# Altium PCB EFI.PcbDoc (part 1 of 3)
Units mm, origin at the board's own origin, x right, y up, seen from the top; angles counter-clockwise.
Board outline 100.1 x 100.83 mm, 2 copper layers (Top Layer, Bottom Layer), stack 1.57 mm thick; 101 components, 85 nets, 326 pads, 97 vias.
Unrouted connection lines stored in the file: 58.
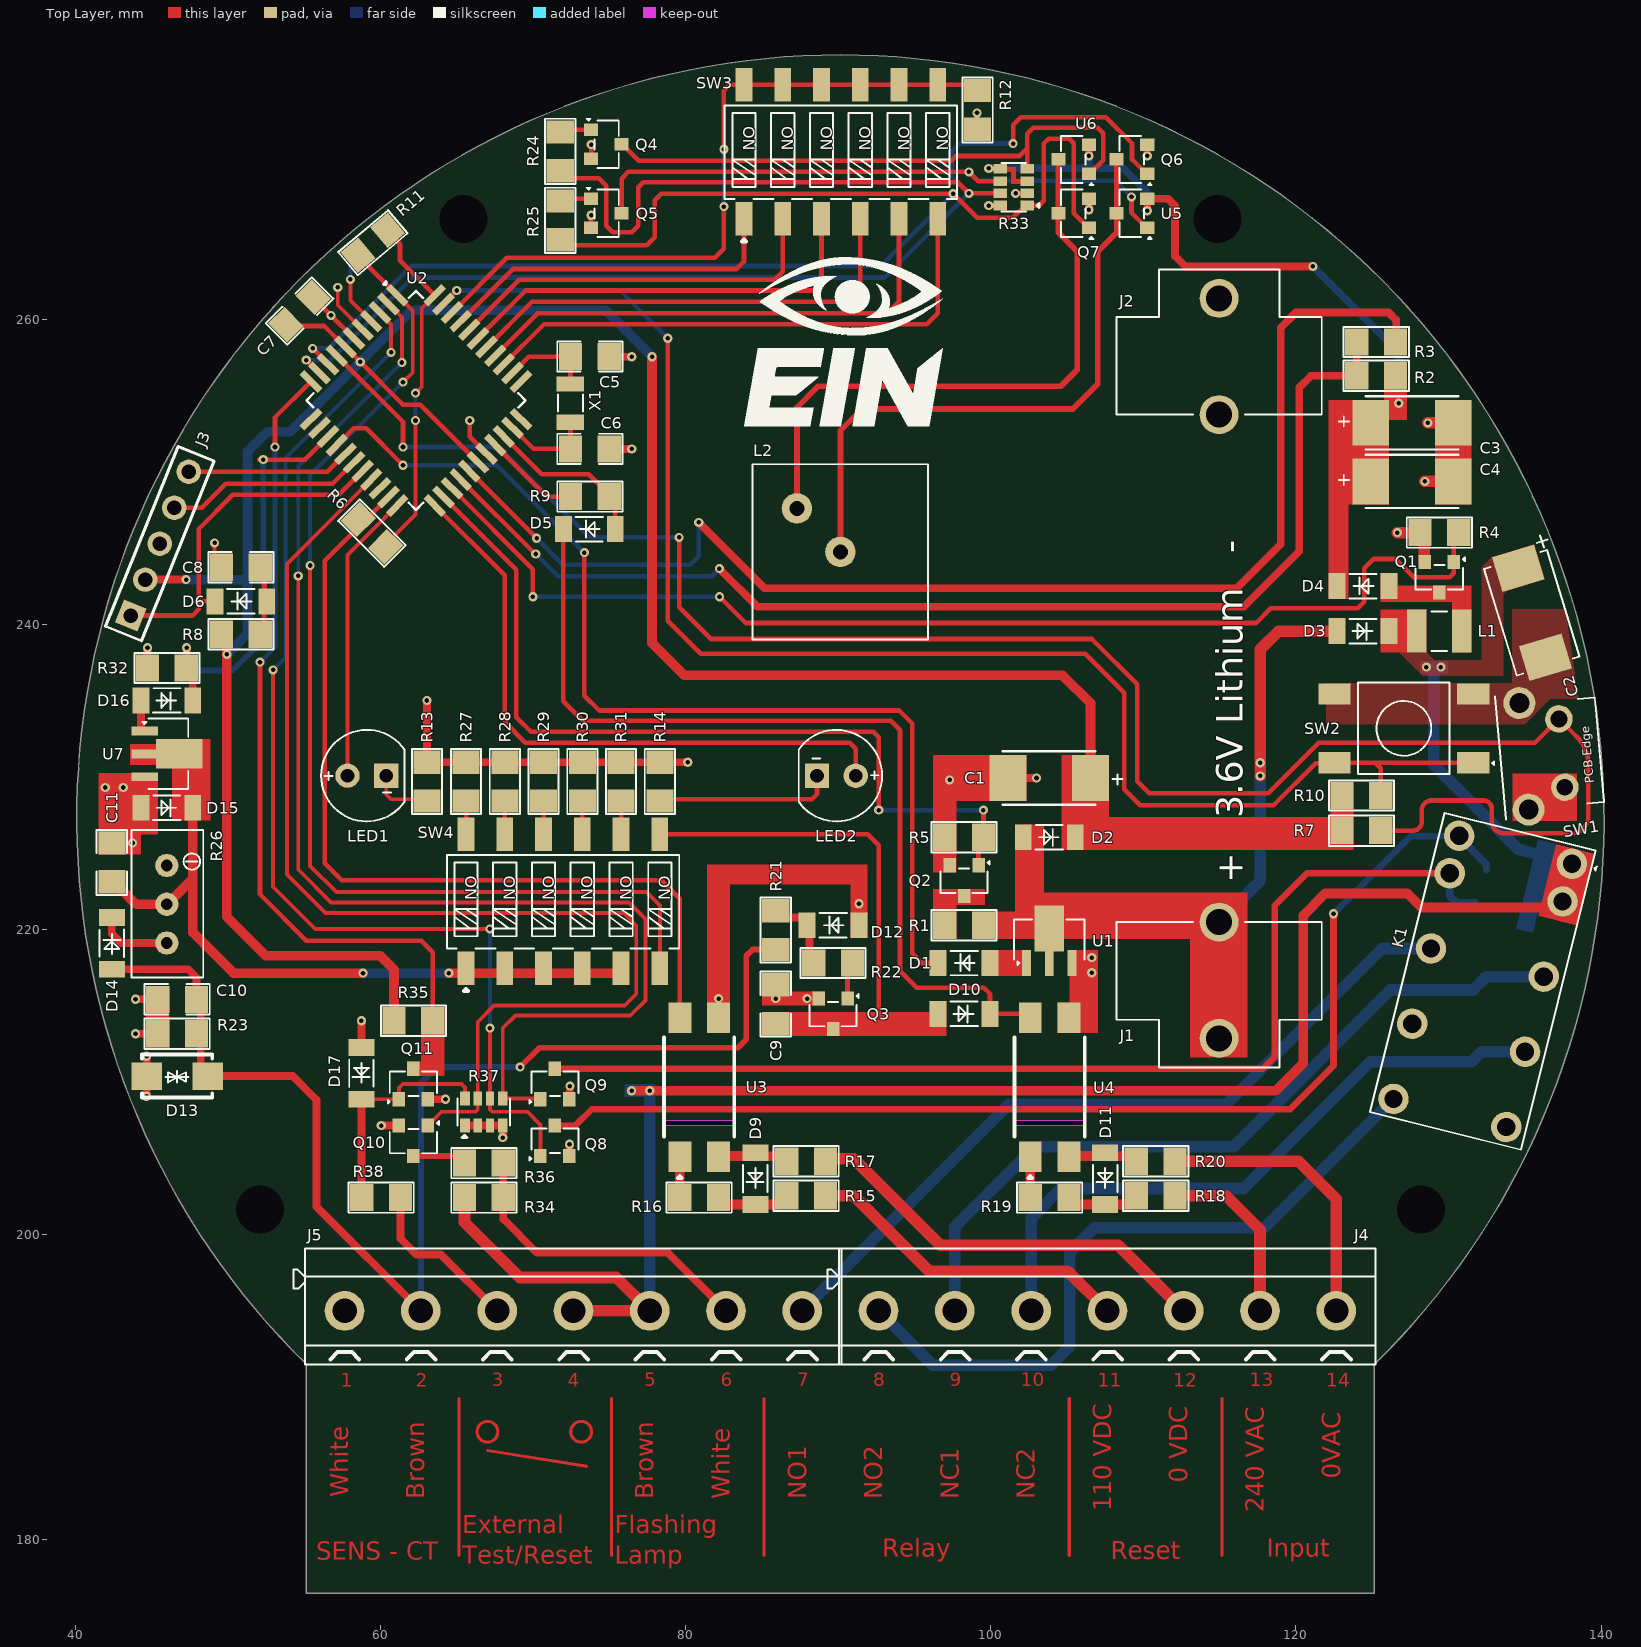
[diagram p0: Top Layer view]
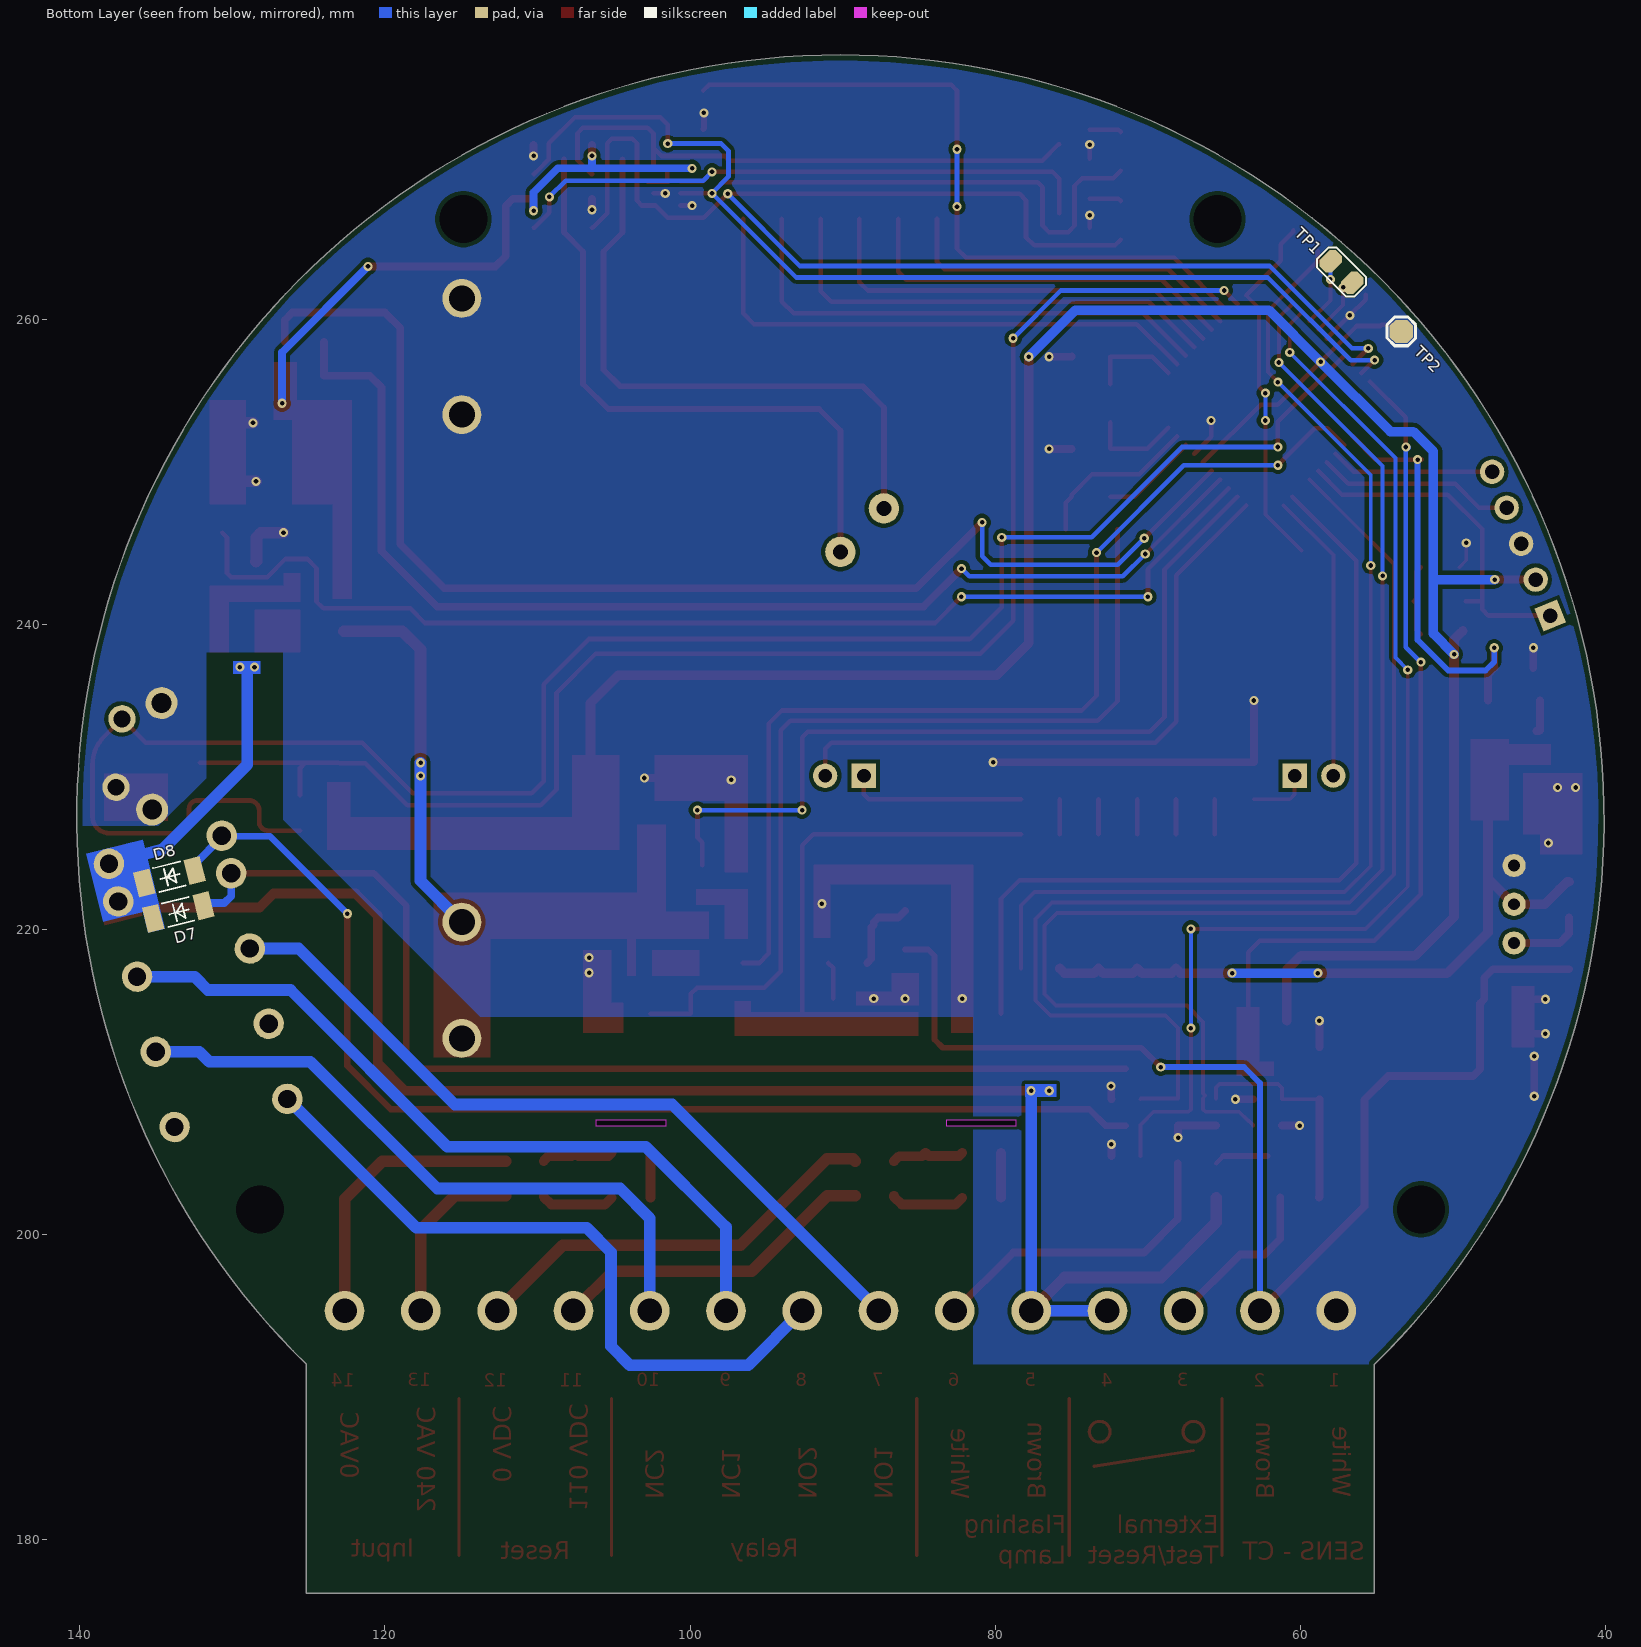
[diagram p1: Bottom Layer view, seen from below]

## Layer stack, top to bottom
Top Solder: solder mask 0.01, Solder Resist, Dk 3.5
Top Layer: signal copper 0.035
Dielectric 1: core 1.5, FR-4, Dk 4.8
Bottom Layer: signal copper 0.035
Bottom Solder: solder mask 0.01, Solder Resist, Dk 3.5

## Board outline
55.145,176.491 55.145,191.491 cw(c90.145,227.267) 125.145,191.491 125.145,176.491
cut-out: 101.576,207.137 101.576,207.48 106.17,207.48 106.17,207.137
cut-out: 78.606,207.137 78.606,207.48 83.199,207.48 83.199,207.137

## Design rules (kind name [scope] priority, off if disabled: settings)
BoardOutlineClearance [All] p1: gap=0 ignorepadtopadclearanceinfootprint=FALSE except(0.381: Poly-OutlineEdge)
Clearance [All] p1: gap=0.254 ignorepadtopadclearanceinfootprint=TRUE
ComponentClearance [All] p1: gap=0 collisioncheckmode=3 verticalgap=0 showdistances=FALSE
HoleSize [All] p1: absolutevalues=TRUE maxlimit=3.15 minlimit=0 maxpercent=80.000 minpercent=20.000
HoleToHoleClearance [All] p1: gap=0 allowstackedmicrovias=TRUE
MinimumSolderMaskSliver [All] p1: minsoldermaskwidth=0
PolygonConnect [All] p1: connectstyle=Direct reliefconductorwidth=0.254 reliefentries=4 polygonreliefangle="90 Angle" airgapwidth=0.254
RoutingVias [All] p1: holewidth=0.3 width=0.6 viastyle="Through Hole" minholewidth=0.3 minwidth=0.6 maxholewidth=0.3 maxwidth=0.6
SilkToSilkClearance [All] p1: silktosilkclearance=0
SilkToSolderMaskClearance [IsPad] p1: minsilkscreentomaskgap=0 clearancetoexposedcopper=TRUE
SolderMaskExpansion [All] p1: expansion=0.102 istentingtop=FALSE
UnRoutedNet [All] p1: checkbadconnections=TRUE
Width [All] p1: maxlimit=0.762 minlimit=0.203 preferedwidth=0.254 minimp=50.000000 maximp=50.000000 favimp=50.000000
23 further rules are at their usual default settings.

## Classes and differential pairs
component class U_Power_Sheet: C1 C2 C3 C4 D1 D2 D3 D4 J1 J2 L1 Q1 Q2 R1 R2 R3 R4 R5 U1
component class U_Peripheral_Sheet: C9 C10 C11 D7 D8 D9 D10 D11 D12 D13 D14 D15 D16 D17 K1 Q3 Q4 Q5 Q6 Q7 Q8 Q9 Q10 Q11 R15 R16 R17 R18 R19 R20 R21 R22 R23 R24 R25 R26 R27 R28 R29 R30 R31 R32 R33 R34 R35 R36 R37 SW4 U3 U4 U5 U6 U7
component class U_Controller_Sheet: C5 C6 C7 C8 D5 D6 J3 LED1 R6 R7 R8 R9 R10 R11 R12 R13 R14 SW1 SW3 TP1 TP2 U2 X1
component class U_Connector_Sheet: J4 J5 R38

## Components (designator, comment, footprint, x,y, rotation, side; value= is the part's Value field where it differs from the comment)
C1 "47uF" Case-C 103.831,229.921 r180 top
C2 "100uF" Case-D 135.459,240.745 r287 top
C3 "47uF" Case-C 127.603,253.196 r0 top
C4 "47uF" Case-C 127.603,249.361 r0 top
C5 "15pF" Cap-1206 73.718,257.54 r180 top
C6 "15pF" Cap-1206 73.718,251.493 r180 top
C7 "0.1uF" Cap-1206 54.697,260.526 r225 top value=100nF
C8 "0.1uF" Cap-1206 50.851,243.735 r0 top value=100nF
C9 "0.047uF" Cap-1206 85.903,215.098 r270 top
C10 "0.047uF" Cap-1206 46.674,215.413 r0 top
C11 "0.047uF" Cap-1206 42.39,224.387 r270 top
D1 "LL4148_1" LL-34 98.247,217.79 r0 top
D2 "LL4148_1" LL-34 103.831,226.035 r180 top
D3 "LL4148_1" LL-34 124.396,239.546 r180 top
D4 "LL4148_1" LL-34 124.396,242.494 r0 top
D5 "LL4148_1" LL-34 73.685,246.228 r0 top
D6 "LL4148_1" LL-34 50.851,241.5 r0 top
D7 "LL4148_1" LL-34 133.541,221.133 r166 bottom
D8 "LL4148_1" LL-34 134.12,223.448 r166 bottom
D9 "ZMM2V7" LL-34 84.572,203.663 r90 top
D10 "LL4148_1" LL-34 98.247,214.463 r180 top
D11 "ZMM2V7" LL-34 107.498,203.663 r90 top
D12 "ZMM3V6" LL-34 89.662,220.269 r0 top
D13 "SMAJ48CA-E3/61" "SMA Bi Directional" 46.674,210.384 r0 top
D14 "LL4148_1" LL-34 42.39,219.081 r270 top
D15 "ZMM3V6" LL-34 45.997,227.969 r180 top
D16 "LL4148_1" LL-34 45.999,235.001 r180 top
D17 "ZMM3V6" LL-34 58.75,210.564 r90 top
J1 "BK-92" BK-92 114.96,216.662 r180 top locked
J2 "BK-92" BK-92 114.96,257.542 r0 top locked
J3 "X6511WV-05H-C60D30" HDR1X5_ 43.628,240.566 r68 top
J4 "JL301-50007U02" JL301-50007U02 107.645,194.991 r180 top locked
J5 "JL301-50007U02" JL301-50007U02 72.645,194.991 r180 top locked
K1 "AZ832P2-2C-3DE" AZ832P2-2C-3DE 132.241,216.589 r256 top locked
L1 "100uH" NLV32T-101J-EF 129.397,239.546 r0 top
L2 "30NR" 30NR 88.72,246.158 r0 top locked
LED1 "333-2UYD/S530-A3-L" "TH LED 5mm Yellow" 59.106,230.073 r180 top
LED2 "333-2SURC/S530-A3" "TH LED 5mm_" 89.877,230.073 r0 top locked
Q1 "DMG3420UQ-7" SOT-23 129.397,243.09 r180 top
Q2 "DMG3420UQ-7" SOT-23 98.247,223.199 r180 top
Q3 "BC847C,215" SOT-23 89.662,214.463 r180 top
Q4 "BC846B-7-F" SOT-23 74.803,271.45 r270 top
Q5 "BC846B-7-F" SOT-23 74.803,266.929 r270 top
Q6 "DMG3420UQ-7" SOT-23 109.254,270.459 r90 top
Q7 "DMG3420UQ-7" SOT-23 105.428,266.929 r90 top
Q8 "DMG3420UQ-7" SOT-23 71.435,206.137 r0 top
Q9 "DMG3420UQ-7" SOT-23 71.435,209.864 r0 top
Q10 "DMG3420UQ-7" SOT-23 62.154,206.137 r180 top
Q11 "DMG3420UQ-7" SOT-23 62.154,209.864 r0 top
R1 "60.4R" Res-1206 98.247,220.269 r0 top
R2 "220K" Res-1206 125.263,256.284 r0 top
R3 "47K" Res-1206 125.263,258.496 r180 top
R4 "10K" Res-1206 129.397,245.999 r0 top value=10kR
R5 "10K" Res-1206 98.247,226.035 r0 top value=10kR
R6 "220K" Res-1206 59.435,245.969 r135 top
R7 "10K" Res-1206 124.292,226.466 r180 top value=10kR
R8 "220K" Res-1206 50.851,239.341 r180 top
R9 "220K" Res-1206 73.718,248.361 r180 top
R10 "10K" Res-1206 124.292,228.778 r180 top value=10kR
R11 "220K" Res-1206 59.496,265.006 r220 top
R12 "220K" Res-1206 99.136,273.71 r90 top
R13 "150R" Res-1206 63.043,229.679 r270 top
R14 "150R" Res-1206 78.309,229.679 r270 top
R15 "27K" Res-1206 87.899,202.54 r180 top
R16 "330R" Res-1206 80.889,202.416 r180 top
R17 "27K" Res-1206 87.899,204.8 r180 top
R18 "220K" Res-1206 110.81,202.54 r0 top
R19 "330R" Res-1206 103.859,202.416 r180 top
R20 "220K" Res-1206 110.81,204.8 r0 top
R21 "220K" Res-1206 85.903,219.949 r270 top
R22 "220K" Res-1206 89.662,217.79 r180 top
R23 "6.8K" Res-1206 46.674,213.153 r0 top
R24 "10K" Res-1206 71.78,270.993 r270 top value=10kR
R25 "10K" Res-1206 71.78,266.471 r270 top value=10kR
R26 "100K" T93YA104KT20 45.997,221.644 r270 top value=100kR
R27 "9.76K" Res-1206 65.609,229.679 r90 top
R28 "3.65K" Res-1206 68.149,229.679 r90 top value=3.65kR
R29 "2.49K" Res-1206 70.689,229.679 r90 top
R30 "1.96K" Res-1206 73.228,229.679 r90 top value=1.96kR
R31 "1.5K" Res-1206 75.769,229.679 r90 top value=1.5kR
R32 "220K" Res-1206 45.999,237.134 r180 top
R33 "10K" 0603x4 101.508,268.639 r180 top value=10kR
R34 "10K" Res-1206 66.772,202.416 r180 top value=10kR
R35 "10K" Res-1206 62.154,214.008 r180 top value=10kR
R36 "47R" Res-1206 66.772,204.677 r180 top
R37 "100K" YC164-JR-070RL 66.772,208.022 r90 top
R38 "150R" Res-1206 60.047,202.416 r0 top
SW1 "1825027-8" 1825027-8 136.188,231.445 r95 top locked
SW2 "FSM6JSMATR" FSM6JSMATR 127.072,233.172 r180 top
SW3 "SMXS-06K-TP" SMXS-06K-TP 90.17,270.961 r90 top
SW4 "SMXS-06K-TP" SMXS-06K-TP 71.959,221.838 r90 top
TP1 "2 Test Pad" "2 Test Pad" 56.604,262.373 r45 bottom
TP2 "TEST POINT" Test-point 53.382,259.189 r180 bottom
U1 "XC61CC2502PR-G" SOT-89-3 103.831,218.923 r0 top
U2 "PIC16F887-I/PT" "44-TQFP (10x10)" 62.325,254.668 r315 top locked
U3 "SFH6156-2" SFH6156-2 80.889,209.659 r90 top
U4 "SFH6156-2" SFH6156-2 103.859,209.659 r90 top
U5 "DMP2305U-7" SOT-23 109.254,266.929 r90 top
U6 "DMP2305U-7" SOT-23 105.428,270.459 r90 top
U7 "XC61CC3002PR-G" SOT-89-3 45.672,231.497 r270 top
X1 "Q13FC13500004" SMD3215-2P 72.451,254.492 r270 top

## Footprints (in the part's own frame and the unit in brackets; to place one, negate y for a bottom-side part, rotate by r counter-clockwise, add the part's x,y. Pads: shape width x height; smd on the part's side, far side on the other; paste and mask are expansions set on the pad)
"2 Test Pad" [mil]
  oct 45x60 smd: 1(0,0) 2(78.74,0)
  silkscreen extent -29,-36 108,36
30NR [mm]
  round 2 hole 1: R(1.425,-1.425) S(-1.425,1.425)
  silkscreen extent -4.33,-7.17 7.17,4.33, body extent -4.33,-7.17 7.18,4.33, height 21.1
"44-TQFP (10x10)" [mm]
  rect 1.684x0.448 smd paste+0 mask+0.051: 1(-5.742,4) 2(-5.742,3.2) 3(-5.742,2.4) 4(-5.742,1.6) 5(-5.742,0.8) 6(-5.742,0) 7(-5.742,-0.8) 8(-5.742,-1.6) 9(-5.742,-2.4) 10(-5.742,-3.2) 11(-5.742,-4) 23(5.742,-4) 24(5.742,-3.2) 25(5.742,-2.4) 26(5.742,-1.6) 27(5.742,-0.8) 28(5.742,0) 29(5.742,0.8) 30(5.742,1.6) 31(5.742,2.4) 32(5.742,3.2) 33(5.742,4)
  rect 0.448x1.684 smd paste+0 mask+0.051: 12(-4,-5.742) 13(-3.2,-5.742) 14(-2.4,-5.742) 15(-1.6,-5.742) 16(-0.8,-5.742) 17(0,-5.742) 18(0.8,-5.742) 19(1.6,-5.742) 20(2.4,-5.742) 21(3.2,-5.742) 22(4,-5.742) 34(4,5.742) 35(3.2,5.742) 36(2.4,5.742) 37(1.6,5.742) 38(0.8,5.742) 39(0,5.742) 40(-0.8,5.742) 41(-1.6,5.742) 42(-2.4,5.742) 43(-3.2,5.742) 44(-4,5.742)
  silkscreen extent -6.89,-5.08 5.08,5.08, body extent -6,-6 6,6, height 1.3
0603x4 [mm]
  rect 0.9x0.63 smd: 1(-0.885,1.2) 2(-0.885,0.4) 3(-0.885,-0.4) 4(-0.885,-1.2) 5(0.885,-1.2) 6(0.885,-0.4) 7(0.885,0.4) 8(0.885,1.2)
  silkscreen extent -1.65,-1.6 0.8,1.6, body extent -0.8,-1.6 0.8,1.6, height 0.7
1825027-8 [mm]
  round 1.8 hole 1.1: 1(-2.25,-1.245) 2(2.25,-1.245)
  round 2.1 hole 1.3: SH1(-3.505,1.245) SH2(3.505,1.245)
  silkscreen extent -4.01,-3.71 4.06,2.79, body extent -4.18,-7.11 4.23,2.73, height 8
AZ832P2-2C-3DE [mm]
  round 2 hole 1.2: 1(-8.89,3.81) 2(-6.35,3.81) 4(-1.27,3.81) 6(3.81,3.81) 8(8.89,3.81) 9(8.89,-3.81) 11(3.81,-3.81) 13(-1.27,-3.81) 15(-6.35,-3.81) 16(-8.89,-3.81)
  silkscreen extent -10.1,-5.1 10.1,5.44, body extent -10.1,-5.11 10.1,5.11, height 11.3
BK-92 [mm]
  round 2.55 hole 1.7: 1(0,3.81) 1(0,-3.81)
  silkscreen extent -6.73,-3.81 6.73,5.71, body extent -6.73,-3.82 6.73,5.7, height 17.41
Cap-1206 [mil] "SMD 1206"
  rect 60x70 smd: 1(-50,0) 2(50,0)
  silkscreen extent -84,-39 84,39, body extent -63,-31 63,32, height 39
Case-C [mm]
  rect 2.4x3 smd: 1(-2.7,0) 2(2.7,0)
  silkscreen extent -4.8,-1.75 3.05,1.75, body extent -3.1,-1.67 3.1,1.68, height 2.46
Case-D [mm]
  rect 2.4x2.9 smd: 1(-3.05,0) 2(3.05,0)
  silkscreen extent -4.7,-2.15 3.65,2.39, body extent -3.7,-2.22 3.7,2.23, height 3.01
FSM6JSMATR [mm]
  rect 2.1x1.4 smd: 1(-4.55,2.25) 2(4.55,2.25) 3(-4.55,-2.25) 4(4.55,-2.25)
  silkscreen extent -5.91,-3 3,3, body extent -5,-3 5,3, height 7.26
HDR1X5_ [mm] "Connector; Header; 5 Position"
  rect 1.6x1.6 hole 0.95: 1(0,0)
  round 1.6 hole 0.95: 2(2.54,0) 3(5.08,0) 4(7.62,0) 5(10.16,0)
  silkscreen extent -1.27,-1.27 11.43,1.27, body extent -1.27,-1.27 11.43,1.23, height 8.65
JL301-50007U02 [mm]
  round 2.6 hole 1.6 paste-2539.97 mask+0.051: 1(-15,0) 2(-10,0) 3(-5,0) 4(0,0) 5(5,0) 6(10,0) 7(15,0)
  silkscreen extent -17.58,-4.1 18.34,3.5, body extent -17.53,-4.04 18,3.56, height 10.15
LL-34 [mm]
  rect 1.1x1.7 smd paste+0 mask+0.051: 1(-1.7,0) 2(1.7,0)
  silkscreen extent -0.9,-0.8 0.9,0.8, body extent -1.7,-0.74 1.7,0.74, height 1.5
NLV32T-101J-EF [mm]
  rect 1.27x2.81 smd: 1(-1.471,0) 2(1.471,0)
  silkscreen extent -0.52,-1.3 0.52,1.3, body extent -1.6,-1.25 1.6,1.25, height 2.2
Res-1206 [mil]
  rect 60x70 smd: 1(-50,0) 2(50,0)
  silkscreen extent -84,-39 84,39, body extent -63,-31 63,31, height 24
SFH6156-2 [mm]
  rect 2x1.5 smd: 1(-4.55,1.27) 2(-4.55,-1.27) 3(4.55,-1.27) 4(4.55,1.27)
  silkscreen extent -5.96,-2.3 3.25,2.3, body extent -4.9,-2.35 4.9,2.35, height 3.67
"SMA Bi Directional" [mm]
  rect 2x1.8 smd paste+0 mask+0.051: 1(-2,0) 2(2,0)
  silkscreen extent -2.3,-1.4 2.3,1.4, body extent -2.6,-1.3 2.6,1.3, height 2.4
SMD3215-2P [mm]
  rect 1x1.8 smd: 1(-1.25,0) 2(1.25,0)
  silkscreen extent -0.56,-0.81 0.56,0.81, body extent -1.6,-0.75 1.6,0.75, height 0.8
SMXS-06K-TP [mm]
  rect 2.2x1.1 smd: 1(-4.4,6.35) 2(-4.4,3.81) 3(-4.4,1.27) 4(-4.4,-1.27) 5(-4.4,-3.81) 6(-4.4,-6.35) 7(4.4,-6.35) 8(4.4,-3.81) 9(4.4,-1.27) 10(4.4,1.27) 11(4.4,3.81) 12(4.4,6.35)
  silkscreen extent -5.88,-7.62 3.05,7.61, body extent -4.7,-7.63 4.7,7.63, height 4
SOT-23 [mm] "TRANS NPN 40V 0.6A SOT23"
  rect 0.82x0.92 smd: 1(-0.95,-1) 2(0.95,-1) 3(0,1)
  silkscreen extent -1.68,-1.3 1.55,0.81, body extent -1.5,-1.25 1.5,1.25, height 1.05
SOT-89-3 [mm]
  rect 0.58x1.73 smd: 1(-1.5,-1.132) 2(0,-1.132) 3(1.5,-1.132)
  rect 1.933x3.03 smd: 2(0,1.132)
  silkscreen extent -2.31,-1.27 2.31,1.73, body extent -2.25,-1.84 2.25,2.41, height 1.54
T93YA104KT20 [mil]
  round 60 hole 30: 1(-100,0) 2(0,0) 3(100,0)
  silkscreen extent -192,-91 189,94, body extent -190,-89 188,92, height 433
Test-point [mil]
  oct 60x60 smd: 1(0,0)
  silkscreen extent -37,-37 37,37
"TH LED 5mm Yellow" [mm]
  rect 1.6x1.6 hole 0.9: 1(-1.27,0)
  round 1.6 hole 0.9: 2(1.27,0)
  silkscreen extent -2.47,-3 3,3, body extent -2.5,-3 3,3, height 9.44
"TH LED 5mm_" [mm]
  rect 1.6x1.6 hole 0.9: 1(-1.27,0)
  round 1.6 hole 0.9: 2(1.27,0)
  silkscreen extent -2.47,-3 3,3, body extent -2.5,-3 3,3, height 9.44
YC164-JR-070RL [mm]
  rect 0.9x0.65 smd: 1(-0.885,1.24) 4(-0.885,-1.24) 5(0.885,-1.24) 8(0.885,1.24)
  rect 0.9x0.53 smd: 2(-0.885,0.4) 3(-0.885,-0.4) 6(0.885,-0.4) 7(0.885,0.4)
  silkscreen extent -1.68,-1.72 0.88,1.72, body extent -0.8,-1.6 0.8,1.6, height 0.7

## Part data
C1 C3 C4: library part 293D476X9016C2TE3, "CAP TANT 47UF 10% 16V 2312", LCSC Part Number=C129697, Manufacturer="Vishay Sprague", ComponentLink1Description=https://datasheet.ciiva.com/11793/0900766b80d97b37-11793330.pdf?src-supplier=Rs, ComponentLink1URL=https://datasheet.ciiva.com/11793/0900766b80d97b37-11793330.pdf?src-supplier=Rs, ComponentLink2Description=https://datasheet.ciiva.com/16305/293d-16305383.pdf?src-supplier=Future+Electronics, ComponentLink2URL=https://datasheet.ciiva.com/16305/293d-16305383.pdf?src-supplier=Future+Electronics, ComponentLink3Description=https://datasheet.ciiva.com/22695/438417-22695173.pdf?src-supplier=Element14, ComponentLink3URL=https://datasheet.ciiva.com/22695/438417-22695173.pdf?src-supplier=Element14, ComponentLink4Description=https://datasheet.ciiva.com/3004/293d-3004007.pdf?src-supplier=Avnet, ComponentLink4URL=https://datasheet.ciiva.com/3004/293d-3004007.pdf?src-supplier=Avnet, ComponentLink5Description=https://datasheet.ciiva.com/12910/293d-239871-12910805.pdf?src-supplier=Mouser, ComponentLink5URL=https://datasheet.ciiva.com/12910/293d-239871-12910805.pdf?src-supplier=Mouser, ComponentLink6Description=https://datasheet.ciiva.com/259/293d-259267.pdf?src-supplier=Digikey, ComponentLink6URL=https://datasheet.ciiva.com/259/293d-259267.pdf?src-supplier=Digikey, ComponentLink7Description=https://datasheet.ciiva.com/259/293d-259268.pdf?src-supplier=Digikey, ComponentLink7URL=https://datasheet.ciiva.com/259/293d-259268.pdf?src-supplier=Digikey, ComponentLink8Description=https://datasheet.ciiva.com/259/293d-259269.pdf?src-supplier=Digikey, ComponentLink8URL=https://datasheet.ciiva.com/259/293d-259269.pdf?src-supplier=Digikey, ComponentLink9Description=https://datasheet.ciiva.com/18710/293d-eng-18710842.pdf?src-supplier=Distrelec, ComponentLink9URL=https://datasheet.ciiva.com/18710/293d-eng-18710842.pdf?src-supplier=Distrelec, ComponentLink10Description=https://datasheet.ciiva.com/29244/455699-da-01-en-smd-kondensator-293d476x9016c2te3-500-st-29244151.pdf?src-supplier=Conrad, ComponentLink10URL=https://datasheet.ciiva.com/29244/455699-da-01-en-smd-kondensator-293d476x9016c2te3-500-st-29244151.pdf?src-supplier=Conrad, Item Type=Capacitors, Manufacturer Part Number=293D476X9016C2TE3, Pricing="1=0.47, 10=0.301, 50=0.301, 100=0.262, 1000=0.188, 10000=0.188 (USD)", RoHS=Yes, Stock=4282, Supplier=Mouser
C2: library part 293D107X9010D2TE3, "CAP TANT 100UF 10% 10V 2917", Case Code (Imperial)=2917, Case Code (Metric)=7343, Dielectric Material=Tantalum, ESR (Equivalent Series Resistance)=600mR, LCSC Part Number=C155463, Leakage Current=10uA, Manufacturer="Vishay Sprague", Max Operating Temperature=125°C, Min Operating Temperature=-55°C, Package Quantity=500, Power Rating=100mW, Ripple Current=350mA, Tolerance=10%, Voltage=10V, Case/Package=2917, ComponentLink1Description=https://datasheet.ciiva.com/1463/438417-1463240.pdf?src-supplier=Element14, ComponentLink1URL=https://datasheet.ciiva.com/1463/438417-1463240.pdf?src-supplier=Element14, ComponentLink2Description=https://datasheet.ciiva.com/22695/438417-22695119.pdf?src-supplier=Element14, ComponentLink2URL=https://datasheet.ciiva.com/22695/438417-22695119.pdf?src-supplier=Element14, ComponentLink3Description=https://datasheet.ciiva.com/3003/293d-3003852.pdf?src-supplier=Avnet, ComponentLink3URL=https://datasheet.ciiva.com/3003/293d-3003852.pdf?src-supplier=Avnet, ComponentLink4Description=https://datasheet.ciiva.com/16366/293d-16366280.pdf?src-supplier=Future+Electronics, ComponentLink4URL=https://datasheet.ciiva.com/16366/293d-16366280.pdf?src-supplier=Future+Electronics, ComponentLink5Description=https://datasheet.ciiva.com/15163/getdatasheetpartid-87118-15163221.pdf?src-supplier=Verical, ComponentLink5URL=https://datasheet.ciiva.com/15163/getdatasheetpartid-87118-15163221.pdf?src-supplier=Verical, Construction=Flat, Depth=4.3mm, Dissipation Factor=8%, Features="General Purpose", Height=2.8mm, Item Type=Capacitors, Lead Free="Lead Free", Length=7.3mm, Manufacturer Part Number=293D107X9010D2TE3, Mounting Technology="Surface Mount,PCB", Packaging="Tape and Reel", Polarity=Polar, Pricing="1=1.06, 10=0.468, 50=0.468, 100=0.38, 1000=0.265, 10000=0.258 (USD)", Q Factor=8NUMBER, Radiation Hardening=No, Reach SVHC Compliant=Unknown, RoHS=Yes, RoHS Compliant=Yes, Series="TANTAMOUNT®, 293D", Stock=119578, Supplier=Mouser, Termination=SMD/SMT, Voltage Rating=10V, Voltage Rating (DC)=10V, Width=2.8mm
C5 C6: library part CC1206JRNPO9BN150, "CAP CER 15PF 50V C0G/NPO 1206", LCSC Part Number=C541476, Manufacturer=Yageo, ComponentLink1Description=https://datasheet.ciiva.com/156/mlccorderingcode-156381.pdf?src-supplier=Digikey, ComponentLink1URL=https://datasheet.ciiva.com/156/mlccorderingcode-156381.pdf?src-supplier=Digikey, ComponentLink2Description=https://datasheet.ciiva.com/156/mlccorderingcode-156382.pdf?src-supplier=Digikey, ComponentLink2URL=https://datasheet.ciiva.com/156/mlccorderingcode-156382.pdf?src-supplier=Digikey, ComponentLink3Description=https://datasheet.ciiva.com/156/mlccorderingcode-156383.pdf?src-supplier=Digikey, ComponentLink3URL=https://datasheet.ciiva.com/156/mlccorderingcode-156383.pdf?src-supplier=Digikey, ComponentLink4Description=https://datasheet.ciiva.com/26863/getdatasheetpartid-94181-26863045.pdf?src-supplier=Verical, ComponentLink4URL=https://datasheet.ciiva.com/26863/getdatasheetpartid-94181-26863045.pdf?src-supplier=Verical, ComponentLink5Description=https://datasheet.ciiva.com/29242/445461-da-01-en-kerko-chip-1206-np0-15pf-5proz-50vg-29242151.pdf?src-supplier=Conrad, ComponentLink5URL=https://datasheet.ciiva.com/29242/445461-da-01-en-kerko-chip-1206-np0-15pf-5proz-50vg-29242151.pdf?src-supplier=Conrad, Halogen Free=5694HalogenFree, Item Type=Capacitors, Lead Free=5697LeadFree, Manufacturer Part Number=CC1206JRNPO9BN150, Pricing="4000=0.0232, 12000=0.0227, 16000=0.0225, 40000=0.022, 60000=0.0216 (USD)", RoHS=Yes, Stock=4000, Supplier="Future Electronics"
C7 C8: library part CC1206KRX7R9BB104, "CAP CER 0.1UF 50V X7R 1206", Case Code (Imperial)=1206, Case Code (Metric)=3216, Dielectric=X7R, Insulation Resistance=100GR, LCSC Part Number=311-1179-1-ND, Manufacturer=Yageo, Max Operating Temperature=125°C, Min Operating Temperature=-55°C, Tolerance=10%, Voltage=50V, Case/Package=1206, ComponentLink1Description=https://datasheet.ciiva.com/11786/0900766b80d84f1d-11786968.pdf?src-supplier=Rs, ComponentLink1URL=https://datasheet.ciiva.com/11786/0900766b80d84f1d-11786968.pdf?src-supplier=Rs, ComponentLink2Description=https://datasheet.ciiva.com/7978/1489800-7978230.pdf?src-supplier=Element14, ComponentLink2URL=https://datasheet.ciiva.com/7978/1489800-7978230.pdf?src-supplier=Element14, ComponentLink3Description=https://datasheet.ciiva.com/28450/1489800-28450892.pdf?src-supplier=Element14, ComponentLink3URL=https://datasheet.ciiva.com/28450/1489800-28450892.pdf?src-supplier=Element14, ComponentLink4Description=https://datasheet.ciiva.com/144/mlccorderingcode-144906.pdf?src-supplier=Digikey, ComponentLink4URL=https://datasheet.ciiva.com/144/mlccorderingcode-144906.pdf?src-supplier=Digikey, ComponentLink5Description=https://datasheet.ciiva.com/144/mlccorderingcode-144905.pdf?src-supplier=Digikey, ComponentLink5URL=https://datasheet.ciiva.com/144/mlccorderingcode-144905.pdf?src-supplier=Digikey, ComponentLink6Description=https://datasheet.ciiva.com/144/mlccorderingcode-144907.pdf?src-supplier=Digikey, ComponentLink6URL=https://datasheet.ciiva.com/144/mlccorderingcode-144907.pdf?src-supplier=Digikey, ComponentLink7Description=https://datasheet.ciiva.com/5425/upy-gp-np0-16v-to-50v-8-3714-5425561.pdf?src-supplier=Mouser, ComponentLink7URL=https://datasheet.ciiva.com/5425/upy-gp-np0-16v-to-50v-8-3714-5425561.pdf?src-supplier=Mouser, ComponentLink8Description=https://datasheet.ciiva.com/28363/1734573-28363672.pdf?src-supplier=Element14, ComponentLink8URL=https://datasheet.ciiva.com/28363/1734573-28363672.pdf?src-supplier=Element14, ComponentLink9Description=https://datasheet.ciiva.com/46385/1734573-46385063.pdf?src-supplier=Element14, ComponentLink9URL=https://datasheet.ciiva.com/46385/1734573-46385063.pdf?src-supplier=Element14, ComponentLink10Description=https://datasheet.ciiva.com/15189/getdatasheetpartid-251811-15189275.pdf?src-supplier=Verical, ComponentLink10URL=https://datasheet.ciiva.com/15189/getdatasheetpartid-251811-15189275.pdf?src-supplier=Verical, Depth=1.6mm, Halogen Free=5694HalogenFree, Height=0.85mm, Item Type=Capacitor, Lead Free=5697LeadFree, Length=3.2mm, Manufacturer Part Number=CC1206KRX7R9BB104, Material=Ceramic, Mounting Technology="Surface Mount", Packaging="Tape and Reel", Pins=2, Pricing="1=0.19, 10=0.128, 50=0.0764, 100=0.0601, 500=0.04436, 1000=0.03672 (USD)", Radiation Hardening=No, Reach SVHC Compliant=Unknown, RoHS=Yes, RoHS Compliant=Yes, Series=CC, Stock=520624, Supplier=Digikey, Termination=SMD/SMT, Voltage Rating=50V, Voltage Rating (DC)=50V
C9 C10 C11: library part CC1206JRX7R0BB473, "CAP CER 0.047UF 100V X7R 1206", Capacitance=47nF, Case Code (Imperial)=1206, Case Code (Metric)=3216, Dielectric=X7R, LCSC Part Number=C577197, Manufacturer=Yageo, Max Operating Temperature=125°C, Min Operating Temperature=-55°C, Resistor Type=Ceramic, Tolerance=5%, Voltage Rating=100V, Case/Package=1206, Category="Ceramic Capacitors", ComponentLink1Description=https://datasheet.ciiva.com/11465/upy-np0x7r-mv-100-to-630v-9-11465413.pdf?src-supplier=Avnet, ComponentLink1URL=https://datasheet.ciiva.com/11465/upy-np0x7r-mv-100-to-630v-9-11465413.pdf?src-supplier=Avnet, ComponentLink2Description=https://datasheet.ciiva.com/13210/upy-gp-np0-16v-to-50v-8-13210277.pdf?src-supplier=Mouser, ComponentLink2URL=https://datasheet.ciiva.com/13210/upy-gp-np0-16v-to-50v-8-13210277.pdf?src-supplier=Mouser, Construction=Flat, Depth=1.6mm, Height=0.85mm, Item Type=Capacitor, Length=3.2mm, Manufacturer Part Number=CC1206JRX7R0BB473, Mount="Surface Mount", Packaging="Tape and Reel", Pricing 1="1=0.21620, 10=0.10530, 25=0.10420, 100=0.08480, 250=0.08390, 500=0.05860, 1000=0.05090, 3000=0.04900, 6000=0.02930 (USD)", Radiation Hardening=No, RoHS=Yes, RoHS Compliant=Yes, Series=CC, Stock 1=6600, Supplier 1="Arrow Electronics", Supplier Part Number 1=CC1206JRX7R0BB473, Termination=SMD/SMT, Thickness=0.037inch, Voltage Rating (DC)=100V, Width=1.6mm
D1 D2 D3 D4 D5 D6 D7 D8 D10 D14 D16: "100V 1V@50mA 4ns 300mA LL-34 Switching Diodes ROHS", LCSC Part Number=C211750, Manufacturer="Yangzhou Yangjie Elec Tech", Manufacturer Part Number=LL4148, Package=LL-34, ComponentLink1Description=LCSC, ComponentLink1URL=https://www.lcsc.com/product-detail/Switching-Diodes_Yangzhou-Yangjie-Elec-Tech-LL4148_C211750.html, Item Type=Diode
D9 D11: "Independent Type 2.5V~2.9V 500mW 2.7V LL-34 Zener Diodes ROHS", LCSC Part Number=C2891738, Manufacturer="HXY MOSFET", Package=LL-34, ComponentLink1Description=LCSC, ComponentLink1URL=https://www.lcsc.com/product-detail/Zener-Diodes_YONGYUTAI-ZMM2V7_C2891738.html, Item Type=Diode, Manufacturer Part Number=ZMM2V7
D12 D15 D17: "Independent Type 500mW 3.4V~3.8V 3.6V LL-34 Zener Diodes ROHS", LCSC Part Number=C5345988, Manufacturer="HXY MOSFET", Package=LL-34, ComponentLink1Description=LCSC, ComponentLink1URL=https://www.lcsc.com/product-detail/Zener-Diodes_HXY-MOSFET-ZMM3V6_C5345988.html, Item Type=Diode, Manufacturer Part Number=ZMM3V6
D13: "TVS DIODE 48VWM 77.4VC DO214AC", LCSC Part Number=C1973118, Manufacturer="Vishay Semiconductors", ComponentLink1Description=https://datasheet.ciiva.com/23942/1761247-23942001.pdf?src-supplier=Newark, ComponentLink1URL=https://datasheet.ciiva.com/23942/1761247-23942001.pdf?src-supplier=Newark, ComponentLink2Description=https://datasheet.ciiva.com/22636/548547-22636982.pdf?src-supplier=Element14, ComponentLink2URL=https://datasheet.ciiva.com/22636/548547-22636982.pdf?src-supplier=Element14, Item Type="TVS Diodes", Manufacturer Part Number=SMAJ48CA-E3/61, Pricing="1=0.35, 10=0.202, 50=0.202, 100=0.099, 1000=0.099, 10000=0.072 (USD)", RoHS=Yes, Stock=8896, Supplier=Mouser
J1 J2: "BATTERY CONTACT CLIP AA PC PIN", Manufacturer="Memory Protection Devices", ComponentLink1Description=https://datasheet.ciiva.com/4/bk-92-datasheet-4254.pdf?src-supplier=Digikey, ComponentLink1URL=https://datasheet.ciiva.com/4/bk-92-datasheet-4254.pdf?src-supplier=Digikey, Item Type="Battery Holder", Manufacturer Part Number=BK-92, Mounting Technology="Through Hole,PCB", Number of Cells=1, Pricing="1=0.43, 10=0.353, 50=0.3104, 100=0.2934, 250=0.27248, 500=0.25762, 1000=0.24358, 2500=0.2262, 5000=0.21387 (USD)", RoHS=Yes, Series=-, Stock=124155, Supplier=Digikey, Termination="PC Pin"
J3: "Gold 250V 3A Straight Square Pins 2.5mm 5P 260℃ 6mm -40℃~+105℃ 3mm 2.54mm Plugin Black Brass 1x5P Plugin,P=2.54mm Pin Headers ROHS", LCSC Part Number=C706877, Manufacturer=XKB, Package=Plugin,P=2.54mm, ComponentLink1Description=LCSC, ComponentLink1URL=https://www.lcsc.com/product-detail/Pin-Headers_XKB-Connectivity-X6511WV-05H-C60D30_C706877.html, Item Type="Male Header", Manufacturer Part Number=X6511WV-05H-C60D30
J4 J5: "1x7P -40℃~+105℃ 15A 300V Blue 12~24 Direct Insert 5mm 1 7 Plugin,P=5mm Screw Terminal Blocks ROHS", LCSC Part Number=C409139, Manufacturer=JILN, Package=Plugin,P=5mm, ComponentLink1Description=LCSC, ComponentLink1URL=https://www.lcsc.com/product-detail/Screw-Terminal-Blocks_JILN-JL301-50007U02_C409139.html, Item Type="Screw Terminal", Manufacturer Part Number=JL301-50007U02
K1: "Magnetic Latching Relays ROHS", LCSC Part Number=C20262850, Manufacturer=ZETTLER, Package=Custom, ComponentLink1Description=LCSC, ComponentLink1URL=https://www.lcsc.com/product-detail/Magnetic-Latching-Relays_ZETTLER-AZ832P2-2C-3DE_C20262850.html?s_z=n_AZ832P2-2C-3DE, Item Type=Relay, Manufacturer Part Number=AZ832P2-2C-3DE
L1: library part NLV32T-101J-EF, "FIXED IND 100UH 40MA 10 OHM SMD", Case Code (Imperial)=1210, Case Code (Metric)=3225, Current Rating=40mA, DC Resistance (DCR)=10R, LCSC Part Number=C295124, Manufacturer=TDK, Max Operating Temperature=105°C, Min Operating Temperature=-40°C, Package Quantity=2000, Self Resonant Frequency=10MHz, Test Frequency=796kHz, Tolerance=5%, Case/Package=1210, ComponentLink1Description=http://www.mouser.com/ds/2/400/nductor_automotive_standard_nlv32-pfd_en-785075.pdf?src-supplier=Mouser, ComponentLink1URL=http://www.mouser.com/ds/2/400/nductor_automotive_standard_nlv32-pfd_en-785075.pdf?src-supplier=Mouser, ComponentLink2Description=https://product.tdk.com/info/en/catalog/datasheets/inductor_commercial_standard_nlv32-ef_en.pdf?src-supplier=Digikey, ComponentLink2URL=https://product.tdk.com/info/en/catalog/datasheets/inductor_commercial_standard_nlv32-ef_en.pdf?src-supplier=Digikey, ComponentLink3Description=https://product.tdk.com/info/en/catalog/datasheets/inductor_commercial_standard_nlv32-ef_en.pdf?ref_disty=digikey&src-supplier=Digikey, ComponentLink3URL=https://product.tdk.com/info/en/catalog/datasheets/inductor_commercial_standard_nlv32-ef_en.pdf?ref_disty=digikey&src-supplier=Digikey, Core Material=Ferrite, Height=2.2mm, Height - Seated (Max)=0.094inch, Item Type=Inductors, Lead Free="Lead Free", Length=0.126inch, Manufacturer Part Number=NLV32T-101J-EF, Max DC Current=40mA, Mounting Technology="Surface Mount", Packaging="Tape and Reel", Pricing="1=0.22, 10=0.113, 50=0.113, 100=0.103, 1000=0.1, 10000=0.067 (USD)", Q Factor=20, RoHS=Yes, RoHS Compliant=Yes, Series=NLV-EF, Shielding=Unshielded, Stock=17406, Supplier=Mouser, Termination=SMD/SMT, Weight=0.001764oz, Width=0.098inch
L2: "Magnetic Status Indicator"
LED1: "LED YELLOW DIFFUSED 5MM T/H", LCSC Part Number=C88602, Manufacturer=Everlight, Item Type=LED, Manufacturer Part Number=333-2UYD/S530-A3-L, RoHS=No, Supplier=Digikey
LED2: "LED RED CLEAR 5MM ROUND T/H", LCSC Part Number=C125756, Manufacturer=Everlight, ComponentLink1Description=https://datasheet.ciiva.com/14183/07501489-14183693.pdf?src-supplier=Distrelec, ComponentLink1URL=https://datasheet.ciiva.com/14183/07501489-14183693.pdf?src-supplier=Distrelec, ComponentLink2Description=https://datasheet.ciiva.com/2119/333-2surc-s530-a3-2119388.pdf?src-supplier=Digikey, ComponentLink2URL=https://datasheet.ciiva.com/2119/333-2surc-s530-a3-2119388.pdf?src-supplier=Digikey, Item Type=LEDs, Manufacturer Part Number=333-2SURC/S530-A3, Pricing="1=0.45, 10=0.259, 50=0.259, 100=0.127, 1000=0.11, 10000=0.089 (USD)", RoHS=Yes, Stock=2460, Supplier=Mouser
Q1 Q2 Q6 Q7 Q8 Q9 Q10 Q11: "MOSFET BVDSS: 8V~24V SOT23 T&R 3", LCSC Part Number=C5157847, Manufacturer=Diodes, Item Type=MOSFETs, Manufacturer Part Number=DMG3420UQ-7, Pricing="1=0.45, 10=0.276, 100=0.1748, 500=0.1308, 1000=0.11658 (USD)", RoHS=Yes, RoHS Compliant=Yes, Stock=5879, Supplier=Digikey
Q3: "TRANS NPN 45V 0.1A TO-236AB", LCSC Part Number=C8664, Manufacturer=Nexperia, ComponentLink1Description=http://www.farnell.com/datasheets/1856333.pdf?src-supplier=Farnell, ComponentLink1URL=http://www.farnell.com/datasheets/1856333.pdf?src-supplier=Farnell, ComponentLink2Description=https://assets.nexperia.com/documents/data-sheet/BC847_SER.pdf?src-supplier=Digikey, ComponentLink2URL=https://assets.nexperia.com/documents/data-sheet/BC847_SER.pdf?src-supplier=Digikey, ComponentLink3Description=https://datasheet.octopart.com/BC847C%2C215-NXP-Semiconductors-datasheet-20734447.pdf?src-supplier=Farnell, ComponentLink3URL=https://datasheet.octopart.com/BC847C%2C215-NXP-Semiconductors-datasheet-20734447.pdf?src-supplier=Farnell, ComponentLink4Description=https://datasheet.octopart.com/BC847C%2C215-Nexperia-datasheet-164345412.pdf?src-supplier=Future+Electronics, ComponentLink4URL=https://datasheet.octopart.com/BC847C%2C215-Nexperia-datasheet-164345412.pdf?src-supplier=Future+Electronics, ComponentLink5Description=https://datasheet.octopart.com/BC847C%2C215-Nexperia-datasheet-11982477.pdf?src-supplier=Newark, ComponentLink5URL=https://datasheet.octopart.com/BC847C%2C215-Nexperia-datasheet-11982477.pdf?src-supplier=Newark, ComponentLink6Description=https://datasheet.octopart.com/BC847C%2C215-Nexperia-datasheet-5341283.pdf?src-supplier=TME, ComponentLink6URL=https://datasheet.octopart.com/BC847C%2C215-Nexperia-datasheet-5341283.pdf?src-supplier=TME, Item Type=BJTs, Manufacturer Part Number=BC847C,215, Packaging=13Packaging, Pins=3NUMBER, Polarity=5054Direction, Pricing="3000=0.0084, 12000=0.0081, 30000=0.0079, 75000=0.0077, 120000=0.0074 (USD)", RoHS=Yes, RoHS Compliant=Yes, Stock=18000, Supplier="Future Electronics"
Q4 Q5: "TRANS NPN 65V 0.1A SOT23-3", LCSC Part Number=C183643, Manufacturer=Diodes, Supplier Part Number=3888237, Category=BJTs, ComponentLink1Description=https://datasheet.ciiva.com/15139/getdatasheetpartid-139519-15139459.pdf?src-supplier=Verical, ComponentLink1URL=https://datasheet.ciiva.com/15139/getdatasheetpartid-139519-15139459.pdf?src-supplier=Verical, ComponentLink2Description=https://datasheet.ciiva.com/22711/1911717-22711685.pdf?src-supplier=Element14, ComponentLink2URL=https://datasheet.ciiva.com/22711/1911717-22711685.pdf?src-supplier=Element14, Item Type=Transistors, Manufacturer Part Number=BC846B-7-F, Pricing="3000=0.0363, 12000=0.0348, 45000=0.0335, 120000=0.0325, 300000=0.0309 (USD)", RoHS=Yes, Stock=4416000, Supplier="Future Electronics"
R1: library part AC1206FR-0760R4L, "RES SMD 60.4 OHM 1% 1/4W 1206", Case Code (Imperial)=1206, Case Code (Metric)=3216, LCSC Part Number=C144481, Manufacturer=Yageo, Max Operating Temperature=155°C, Max Power Dissipation=250mW, Min Operating Temperature=-55°C, Package Quantity=1, Temperature Coefficient=100ppm/°C, Tolerance=1%, Voltage Rating=200V, Case/Package=1206, ComponentLink1Description=http://www.mouser.com/ds/2/447/yageodocoutput-1111992.pdf?src-supplier=Mouser, ComponentLink1URL=http://www.mouser.com/ds/2/447/yageodocoutput-1111992.pdf?src-supplier=Mouser, ComponentLink2Description=https://datasheet.octopart.com/AC1206FR-0760R4L-Yageo-datasheet-166720450.pdf?src-supplier=Future+Electronics, ComponentLink2URL=https://datasheet.octopart.com/AC1206FR-0760R4L-Yageo-datasheet-166720450.pdf?src-supplier=Future+Electronics, ComponentLink3Description=http://www.yageo.com/NewPortal/yageodocoutput?fileName=/pdf/R-Chip/PYu-AC_51_RoHS_L_6.pdf&src-supplier=Digikey, ComponentLink3URL=http://www.yageo.com/NewPortal/yageodocoutput?fileName=/pdf/R-Chip/PYu-AC_51_RoHS_L_6.pdf&src-supplier=Digikey, ComponentLink4Description=http://www.yageo.com/documents/recent/PYu-AC_51_RoHS_L_2_revised.pdf?src-supplier=Future+Electronics, ComponentLink4URL=http://www.yageo.com/documents/recent/PYu-AC_51_RoHS_L_2_revised.pdf?src-supplier=Future+Electronics, Features="Moisture Resistant,Automotive AEC-Q200,Anti-Sulfur", Height=0.026inch, Item Type=Resistors, Lead Free="Lead Free", Length=0.122inch, Manufacturer Part Number=AC1206FR-0760R4L, Number of Terminations=2, Packaging="Tape and Reel", Power Rating=250mW, Pricing="5000=0.005, 20000=0.0048, 50000=0.0047, 125000=0.0045, 200000=0.0043 (USD)", RoHS=Yes, RoHS Compliant=Yes, Series=AC, Stock=335000, Supplier="Future Electronics", Termination=SMD/SMT, Width=0.063inch
R2 R6 R8 R9 R11 R12 R18 R20 R21 R22 R32: library part RT1206BRD07220KL, "RES SMD 220K OHM 0.1% 1/4W 1206", LCSC Part Number=C309663, Manufacturer=Yageo, Voltage Rating (DC)=200V, ComponentLink1Description=https://datasheet.ciiva.com/2587/pyu-rt-1-to-0-05-rohs-l-5-2587527.pdf?src-supplier=Digikey, ComponentLink1URL=https://datasheet.ciiva.com/2587/pyu-rt-1-to-0-05-rohs-l-5-2587527.pdf?src-supplier=Digikey, Item Type=Resistors, Lead Free=5697LeadFree, Manufacturer Part Number=RT1206BRD07220KL, Pricing="1=0.34, 10=0.225, 50=0.1816, 100=0.1663, 500=0.1326, 1000=0.11628 (USD)", RoHS=Yes, Stock=10004, Supplier=Digikey
R3: library part ARG06BTC4702, "250mW Thin Film Resistor 200V ±25ppm/℃ ±0.1% 47kΩ 1206 Chip Resistor - Surface Mount ROHS", LCSC Part Number=C2828891, Manufacturer="Viking Tech", Package=1206, ComponentLink1Description=LCSC, ComponentLink1URL=https://www.lcsc.com/product-detail/Chip-Resistor-Surface-Mount_Viking-Tech-ARG06BTC4702_C2828891.html, Item Type=Resistor, Manufacturer Part Number=ARG06BTC4702
R4 R5 R7 R10 R24 R25 R34 R35: library part AC1206FR-7W10KL, "RES 10K OHM 1% 1/2W 1206", Case/Package=340Case, LCSC Part Number=C326700, Manufacturer=Yageo, Item Type=Resistors, Manufacturer Part Number=AC1206FR-7W10KL, Packaging=10Packaging, Pricing="1=0.14, 10=0.052, 50=0.052, 100=0.029, 1000=0.018, 10000=0.011 (USD)", RoHS=No, Stock=10222, Supplier=Mouser
R13 R14 R38: library part FRC1206F1500TS, "250mW Thick Film Resistors 200V ±100ppm/℃ ±1% 150Ω 1206 Chip Resistor - Surface Mount ROHS", LCSC Part Number=C2933598, Manufacturer=FOJAN, Package=1206, ComponentLink1Description=LCSC, ComponentLink1URL=https://www.lcsc.com/product-detail/Chip-Resistor-Surface-Mount_FOJAN-FRC1206F1500TS_C2933598.html, Item Type=Resistor, Manufacturer Part Number=FRC1206F1500TS
R15 R17: library part FRC1206F2702TS, "250mW Thick Film Resistors 200V ±100ppm/℃ ±1% 27kΩ 1206 Chip Resistor - Surface Mount ROHS", LCSC Part Number=C2960927, Manufacturer=FOJAN, Package=1206, ComponentLink1Description=LCSC, ComponentLink1URL=https://www.lcsc.com/product-detail/Chip-Resistor-Surface-Mount_FOJAN-FRC1206F2702TS_C2960927.html, Item Type=Resistor, Manufacturer Part Number=FRC1206F2702TS
R16 R19: library part FRC1206F3300TS, "250mW Thick Film Resistors 200V ±100ppm/℃ ±1% 330Ω 1206 Chip Resistor - Surface Mount ROHS", LCSC Part Number=C2933675, Manufacturer=FOJAN, Package=1206, ComponentLink1Description=LCSC, ComponentLink1URL=https://www.lcsc.com/product-detail/Chip-Resistor-Surface-Mount_FOJAN-FRC1206F3300TS_C2933675.html, Item Type=Resistor, Manufacturer Part Number=FRC1206F3300TS
R23: library part AR06BTCV6801A010, "250mW Thin Film Resistor 150V ±25ppm/℃ ±0.1% 6.8kΩ 1206 Chip Resistor - Surface Mount ROHS", LCSC Part Number=C374801, Manufacturer="Viking Tech", Package=1206, ComponentLink1Description=LCSC, ComponentLink1URL=https://www.lcsc.com/product-detail/Chip-Resistor-Surface-Mount_Viking-Tech-AR06BTCV6801A010_C374801.html, Item Type=Resistor, Manufacturer Part Number=AR06BTCV6801A010
R26: library part T93YA104KT20, "TRIMMER 100K OHM 0.5W PC PIN TOP", LCSC Part Number=C7061693, Manufacturer="Vishay Sfernice", Max Operating Temperature=155°C, Max Power Dissipation=500mW, Min Operating Temperature=-55°C, Package Quantity=50, Resistance Tolerance=10%, Resistor Type=Cermet, Temperature Coefficient=100ppm/°C, Voltage Rating=250V, ComponentLink1Description=https://datasheet.ciiva.com/11831/0900766b80ed9ad6-11831453.pdf?src-supplier=Rs, ComponentLink1URL=https://datasheet.ciiva.com/11831/0900766b80ed9ad6-11831453.pdf?src-supplier=Rs, ComponentLink2Description=https://datasheet.ciiva.com/2156/t93-2156473.pdf?src-supplier=Digikey, ComponentLink2URL=https://datasheet.ciiva.com/2156/t93-2156473.pdf?src-supplier=Digikey, ComponentLink3Description=https://datasheet.ciiva.com/16367/t93-16367128.pdf?src-supplier=Future+Electronics, ComponentLink3URL=https://datasheet.ciiva.com/16367/t93-16367128.pdf?src-supplier=Future+Electronics, Depth=5mm, Height=0.386inch, Item Type=Potensiometer, Lead Free="Lead Free", Length=0.382inch, Manufacturer Part Number=T93YA104KT20, Mounting Technology="PCB,Through Hole", Number of Turns=21, Packaging=Rail/Tube, Power Rating=500mW, Pricing="500=0.835, 1000=0.82, 1500=0.815, 2000=0.81, 2500=0.795 (USD)", Radiation Hardening=No, Reach SVHC Compliant=Unknown, RoHS=Yes, RoHS Compliant=Yes, Series=T93, Stock=500, Supplier="Future Electronics", Taper=Linear, Technology=CERMET, Termination=Pin, Tolerance=10%, Voltage Rating (AC)=250V, Width=0.197inch
R27: library part RT1206BRD079K76L, "RES SMD 9.76K OHM 0.1% 1/4W 1206", LCSC Part Number=C870957, Manufacturer=Yageo, ComponentLink1Description=https://datasheet.ciiva.com/2587/pyu-rt-1-to-0-05-rohs-l-5-2587915.pdf?src-supplier=Digikey, ComponentLink1URL=https://datasheet.ciiva.com/2587/pyu-rt-1-to-0-05-rohs-l-5-2587915.pdf?src-supplier=Digikey, Item Type=Resistors, Manufacturer Part Number=RT1206BRD079K76L, Pricing="5000=0.0862 (USD)", RoHS=Yes, Supplier=Digikey
R28: library part RT1206BRD073K65L, "RES SMD 3.65K OHM 0.1% 1/4W 1206", Case Code (Imperial)=1206, Case Code (Metric)=3216, LCSC Part Number=C870714, Manufacturer=Yageo, Max Operating Temperature=155°C, Max Power Dissipation=250mW, Min Operating Temperature=-55°C, Package Quantity=5000, Temperature Coefficient=25ppm/°C, Tolerance=0.1%, Voltage Rating=200V, Case/Package=1206, ComponentLink1Description=https://datasheet.ciiva.com/2587/pyu-rt-1-to-0-05-rohs-l-5-2587684.pdf?src-supplier=Digikey, ComponentLink1URL=https://datasheet.ciiva.com/2587/pyu-rt-1-to-0-05-rohs-l-5-2587684.pdf?src-supplier=Digikey, ComponentLink2Description=https://datasheet.ciiva.com/12812/pyu-rt-1-to-0-05-rohs-l-4-12812222.pdf?src-supplier=Mouser, ComponentLink2URL=https://datasheet.ciiva.com/12812/pyu-rt-1-to-0-05-rohs-l-4-12812222.pdf?src-supplier=Mouser, Height=0.026inch, Item Type=Resistors, Lead Free="Lead Free", Length=0.122inch, Manufacturer Part Number=RT1206BRD073K65L, Number of Terminations=2, Packaging="Tape and Reel", Power Rating=250mW, Pricing="1=0.35, 10=0.246, 50=0.1938, 100=0.1693, 500=0.12954, 1000=0.11424 (USD)", RoHS=Yes, RoHS Compliant=Yes, Series=RT, Stock=4762, Supplier=Digikey, Termination=SMD/SMT, Voltage Rating (DC)=200V, Weight=0.000571oz, Width=1.6mm
R29: library part ARG06BTC2491, "250mW 200V ±25ppm/℃ ±0.1% 2.49kΩ 1206 Chip Resistor - Surface Mount ROHS", LCSC Part Number=C5122072, Manufacturer="Viking Tech", Package=1206, ComponentLink1Description=LCSC, ComponentLink1URL=https://www.lcsc.com/product-detail/Chip-Resistor-Surface-Mount_Viking-Tech-ARG06BTC2491_C5122072.html, Item Type=Resistor, Manufacturer Part Number=ARG06BTC2491
R30: library part RT1206BRD071K96L, "RES SMD 1.96K OHM 0.1% 1/4W 1206", Case Code (Imperial)=1206, Case Code (Metric)=3216, LCSC Part Number=C870518, Manufacturer=Yageo, Max Operating Temperature=125°C, Max Power Dissipation=250mW, Min Operating Temperature=-55°C, Package Quantity=5000, Temperature Coefficient=25ppm/°C, Tolerance=0.1%, Voltage Rating=200V, Case/Package=1206, ComponentLink1Description=https://datasheet.ciiva.com/2587/pyu-rt-1-to-0-05-rohs-l-5-2587508.pdf?src-supplier=Digikey, ComponentLink1URL=https://datasheet.ciiva.com/2587/pyu-rt-1-to-0-05-rohs-l-5-2587508.pdf?src-supplier=Digikey, ComponentLink2Description=https://datasheet.ciiva.com/8894/pyu-rt-1-to-0-05-rohs-l-4-8894855.pdf?src-supplier=Avnet, ComponentLink2URL=https://datasheet.ciiva.com/8894/pyu-rt-1-to-0-05-rohs-l-4-8894855.pdf?src-supplier=Avnet, ComponentLink3Description=https://datasheet.ciiva.com/12706/pyu-rt-1-to-0-05-rohs-l-4-12706684.pdf?src-supplier=Mouser, ComponentLink3URL=https://datasheet.ciiva.com/12706/pyu-rt-1-to-0-05-rohs-l-4-12706684.pdf?src-supplier=Mouser, Contact Plating=Tin,Matte, Height=0.026inch, Item Type=Resistors, Lead Free="Lead Free", Length=0.122inch, Manufacturer Part Number=RT1206BRD071K96L, Number of Terminations=2, Packaging="Tape and Reel", Power Rating=250mW, Pricing="1=0.34, 10=0.246, 50=0.1908, 100=0.1693, 500=0.1275, 1000=0.1122 (USD)", RoHS=Yes, RoHS Compliant=Yes, Series=RT, Stock=1289, Supplier=Digikey, Termination=SMD/SMT, Voltage Rating (DC)=200V, Width=0.063inch
R31: library part RT1206BRD071K5L, "RES SMD 1.5K OHM 0.1% 1/4W 1206", Case Code (Imperial)=1206, Case Code (Metric)=3216, LCSC Part Number=C706403, Manufacturer=Yageo, Max Operating Temperature=125°C, Max Power Dissipation=250mW, Min Operating Temperature=-55°C, Package Quantity=5000, Temperature Coefficient=25ppm/°C, Tolerance=0.1%, Voltage Rating=200V, Case/Package=1206, ComponentLink1Description=https://datasheet.ciiva.com/8895/pyu-rt-1-to-0-05-rohs-l-4-8895366.pdf?src-supplier=Avnet, ComponentLink1URL=https://datasheet.ciiva.com/8895/pyu-rt-1-to-0-05-rohs-l-4-8895366.pdf?src-supplier=Avnet, ComponentLink2Description=https://datasheet.ciiva.com/12703/pyu-rt-1-to-0-05-rohs-l-4-12703031.pdf?src-supplier=Mouser, ComponentLink2URL=https://datasheet.ciiva.com/12703/pyu-rt-1-to-0-05-rohs-l-4-12703031.pdf?src-supplier=Mouser, ComponentLink3Description=https://datasheet.ciiva.com/2587/pyu-rt-1-to-0-05-rohs-l-4-2587497.pdf?src-supplier=Digikey, ComponentLink3URL=https://datasheet.ciiva.com/2587/pyu-rt-1-to-0-05-rohs-l-4-2587497.pdf?src-supplier=Digikey, ComponentLink4Description=https://datasheet.ciiva.com/46635/pyu-rt-1-to-0-05-rohs-l-5-46635017.pdf?src-supplier=Digikey, ComponentLink4URL=https://datasheet.ciiva.com/46635/pyu-rt-1-to-0-05-rohs-l-5-46635017.pdf?src-supplier=Digikey, Contact Plating=Tin,Matte, Features="Moisture Resistant", Height=0.026inch, Item Type=Resistors, Lead Free="Lead Free", Length=0.122inch, Manufacturer Part Number=RT1206BRD071K5L, Number of Terminations=2, Packaging="Tape and Reel", Power Rating=250mW, Pricing="1=0.36, 10=0.261, 50=0.202, 100=0.181, 1000=0.121, 10000=0.089 (USD)", RoHS=Yes, RoHS Compliant=Yes, Series=RT, Stock=5782, Supplier=Mouser, Termination=SMD/SMT, Voltage Rating (DC)=200V, Width=0.063inch
R33: library part 4D03WGJ0103T5E, "4 ±5% 10kΩ 62.5mW ±200ppm/℃ 0603x4 Resistor Networks, Arrays ROHS", LCSC Part Number=C29718, Manufacturer="Royal Electronic Factory", Temperature Coefficient=400ppm/°C, ComponentLink1Description=https://datasheet.octopart.com/4D03WGJ0103T5E-Royal-Ohm-datasheet-158295248.pdf?src-supplier=TME, ComponentLink1URL=https://datasheet.octopart.com/4D03WGJ0103T5E-Royal-Ohm-datasheet-158295248.pdf?src-supplier=TME, Item Type=Resistor, Manufacturer Part Number=4D03WGJ0103T5E, Pricing="10000=0.005 (USD)", RoHS=No, Supplier=Mouser
R36: library part FRC1206F47R0TS, "250mW Thick Film Resistors 200V ±100ppm/℃ ±1% 47Ω 1206 Chip Resistor - Surface Mount ROHS", LCSC Part Number=C2933712, Manufacturer=FOJAN, Package=1206, ComponentLink1Description=LCSC, ComponentLink1URL=https://www.lcsc.com/product-detail/Chip-Resistor-Surface-Mount_FOJAN-FRC1206F47R0TS_C2933712.html, Item Type=Resistor, Manufacturer Part Number=FRC1206F47R0TS
R37: library part YC164-JR-07100KL, "RES ARRAY 4 RES 100K OHM 1206", LCSC Part Number=C192933, Manufacturer=Yageo, Supplier Part Number=4734737, Category="Resistor Arrays", ComponentLink1Description=https://datasheet.ciiva.com/11807/0900766b80c69e1d-11807026.pdf?src-supplier=Rs, ComponentLink1URL=https://datasheet.ciiva.com/11807/0900766b80c69e1d-11807026.pdf?src-supplier=Rs, ComponentLink2Description=https://datasheet.ciiva.com/8017/443424-8017993.pdf?src-supplier=Element14, ComponentLink2URL=https://datasheet.ciiva.com/8017/443424-8017993.pdf?src-supplier=Element14, ComponentLink3Description=https://datasheet.ciiva.com/8017/443424-8017994.pdf?src-supplier=Element14, ComponentLink3URL=https://datasheet.ciiva.com/8017/443424-8017994.pdf?src-supplier=Element14, ComponentLink4Description=https://datasheet.ciiva.com/17478/pyu-yc-tc164-51-rohs-l-3-17478885.pdf?src-supplier=Future+Electronics, ComponentLink4URL=https://datasheet.ciiva.com/17478/pyu-yc-tc164-51-rohs-l-3-17478885.pdf?src-supplier=Future+Electronics, ComponentLink5Description=https://datasheet.ciiva.com/2693/pyu-yc-tc164-51-rohs-l-3-2693249.pdf?src-supplier=Digi-Key, ComponentLink5URL=https://datasheet.ciiva.com/2693/pyu-yc-tc164-51-rohs-l-3-2693249.pdf?src-supplier=Digi-Key, ComponentLink6Description=https://datasheet.ciiva.com/2693/pyu-yc-tc164-51-rohs-l-3-2693250.pdf?src-supplier=Digi-Key, ComponentLink6URL=https://datasheet.ciiva.com/2693/pyu-yc-tc164-51-rohs-l-3-2693250.pdf?src-supplier=Digi-Key, ComponentLink7Description=https://datasheet.ciiva.com/2693/pyu-yc-tc164-51-rohs-l-3-2693251.pdf?src-supplier=Digi-Key, ComponentLink7URL=https://datasheet.ciiva.com/2693/pyu-yc-tc164-51-rohs-l-3-2693251.pdf?src-supplier=Digi-Key, Item Type=Resistor, Manufacturer Part Number=YC164-JR-07100KL, Pricing="5000=0.0086, 20000=0.0082, 50000=0.0078, 100000=0.0078, 125000=0.0075, 200000=0.0076, 625000=0.0071 (USD)", RoHS=Yes, Stock=10000, Supplier="Future Electronics"
SW1: "50mA Lying SPST 24V Plugin Tactile Switches ROHS", Manufacturer="TE Connectivity", Category="Pushbutton Switches", ComponentLink1Description=https://datasheet.ciiva.com/30072/eng-cd-1825027-f-30072833.pdf?src-supplier=Onlinecomponents.com, ComponentLink1URL=https://datasheet.ciiva.com/30072/eng-cd-1825027-f-30072833.pdf?src-supplier=Onlinecomponents.com, ComponentLink2Description=https://datasheet.ciiva.com/16393/1825027-8-16393346.pdf?src-supplier=Future+Electronics, ComponentLink2URL=https://datasheet.ciiva.com/16393/1825027-8-16393346.pdf?src-supplier=Future+Electronics, ComponentLink3Description=https://datasheet.ciiva.com/8164/eng-cd-1825027-g4-8164921.pdf?src-supplier=Avnet, ComponentLink3URL=https://datasheet.ciiva.com/8164/eng-cd-1825027-g4-8164921.pdf?src-supplier=Avnet, Item Type="Tactile Switch", Manufacturer Part Number=1825027-8, Pricing 1="1=0.13800, 10=0.13370, 25=0.12590, 100=0.10940, 250=0.10570, 500=0.09520, 1000=0.07320, 2500=0.07250, 5000=0.06250 (USD)", RoHS=Yes, Stock 1=178529, Supplier 1="Arrow Electronics", Supplier Part Number 1=1825027-8
SW2: "SWITCH TACTILE SPST-NO 0.05A 24V", LCSC Part Number=C6558197, Manufacturer="TE Connectivity Alcoswitch", ComponentLink1Description=https://datasheet.ciiva.com/7097/1486952-7097325.pdf?src-supplier=Newark, ComponentLink1URL=https://datasheet.ciiva.com/7097/1486952-7097325.pdf?src-supplier=Newark, ComponentLink2Description=https://datasheet.ciiva.com/1530/1714712-1530976.pdf?src-supplier=Element14, ComponentLink2URL=https://datasheet.ciiva.com/1530/1714712-1530976.pdf?src-supplier=Element14, ComponentLink3Description=https://datasheet.ciiva.com/15184/getdatasheetpartid-167889-15184443.pdf?src-supplier=Verical, ComponentLink3URL=https://datasheet.ciiva.com/15184/getdatasheetpartid-167889-15184443.pdf?src-supplier=Verical, ComponentLink4Description=https://datasheet.ciiva.com/8082/eng-cs-1308111-1-switches-core-program-catalog-0308-8082682.pdf?src-supplier=Avnet, ComponentLink4URL=https://datasheet.ciiva.com/8082/eng-cs-1308111-1-switches-core-program-catalog-0308-8082682.pdf?src-supplier=Avnet, Item Type=Switches, Manufacturer Part Number=FSM6JSMATR, Number of Positions=2NUMBER, RoHS=Yes, RoHS Compliant=5897YesNo, Stock=735, Supplier=Rs
SW3 SW4: "6 digits 24V Black 25mA 3000 Times SMD DIP Switches ROHS", LCSC Part Number=C5439765, Manufacturer="SM Switch", Package=SMD, ComponentLink1Description=LCSC, ComponentLink1URL=https://www.lcsc.com/product-detail/DIP-Switches_SM-Switch-SMXS-06K-TP_C5439765.html, Item Type="DIP SWITCH", Manufacturer Part Number=SMXS-06K-TP